# Altium PCB PCB_ESP_SparkBot_V1.1.pcbdoc (part 1 of 2)
Units mil, origin at the board's own origin, x right, y up, seen from the top; angles counter-clockwise.
Board outline 2353.91 x 3416.24 mil, 2 copper layers (Top Layer, Bottom Layer); 135 components, 107 nets, 461 pads, 252 vias.
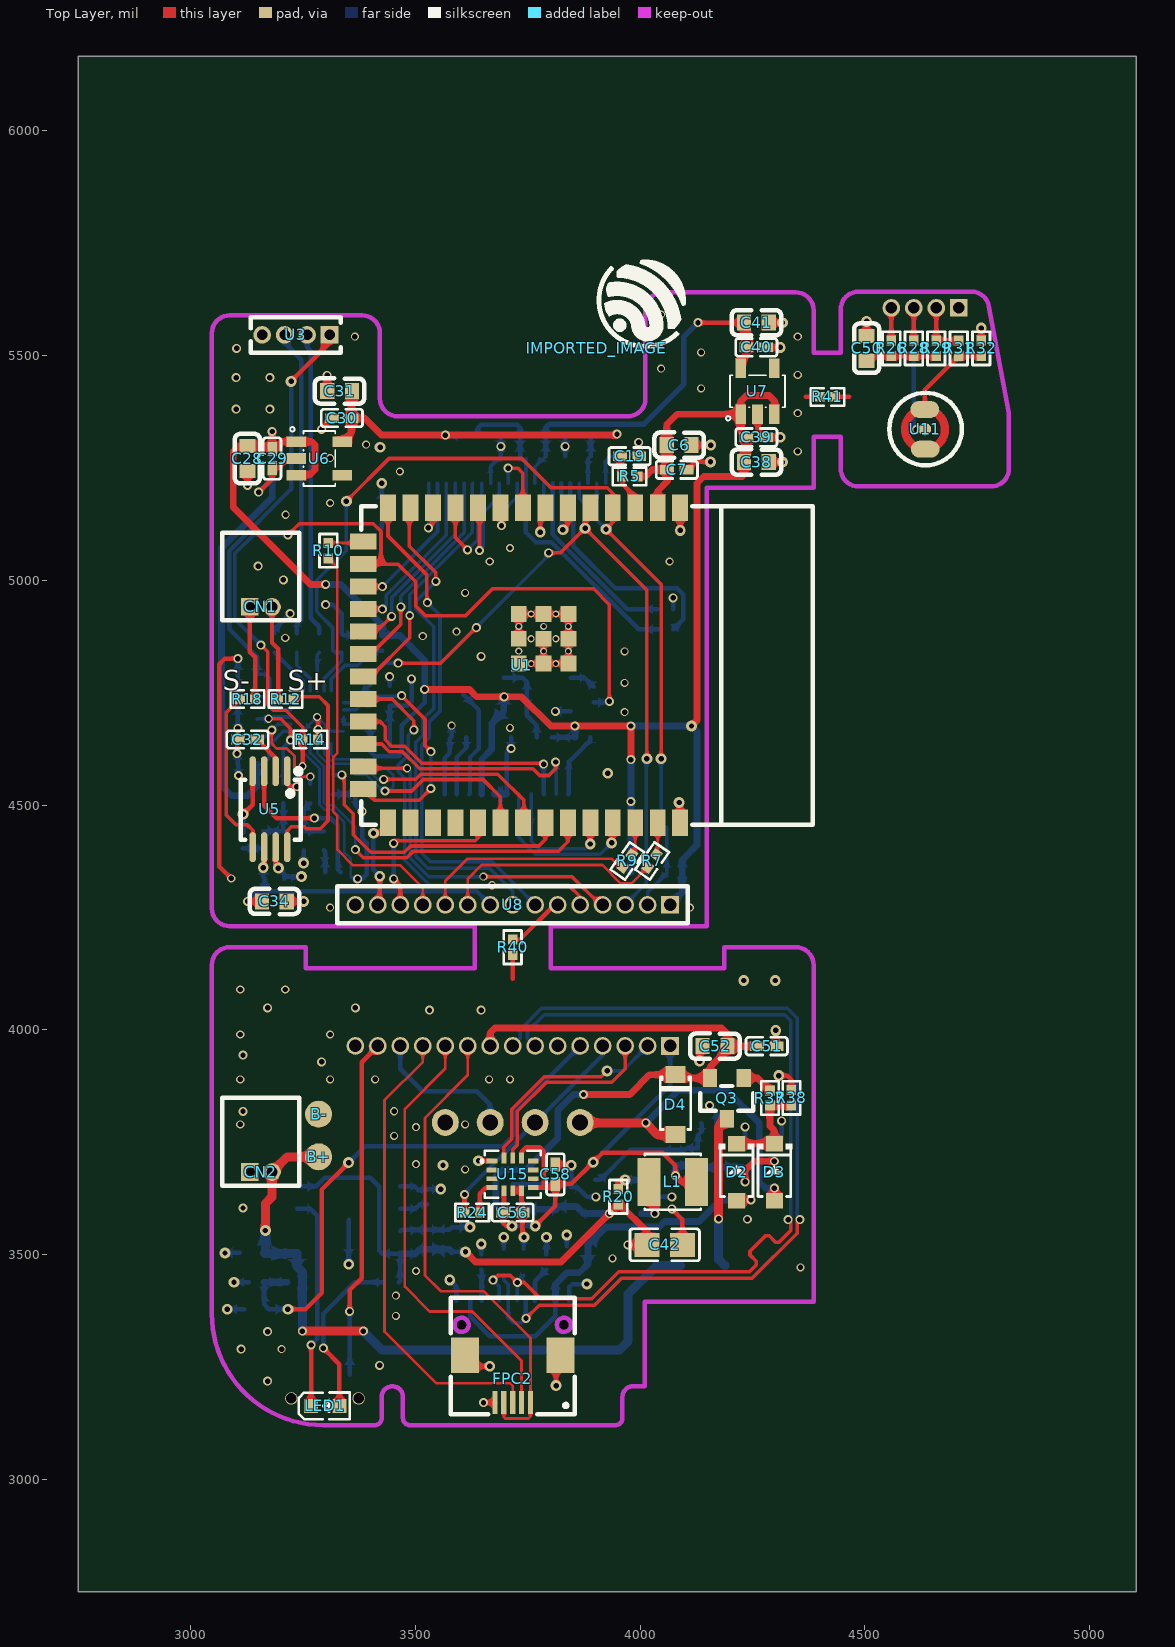
[diagram p0: Top Layer view]
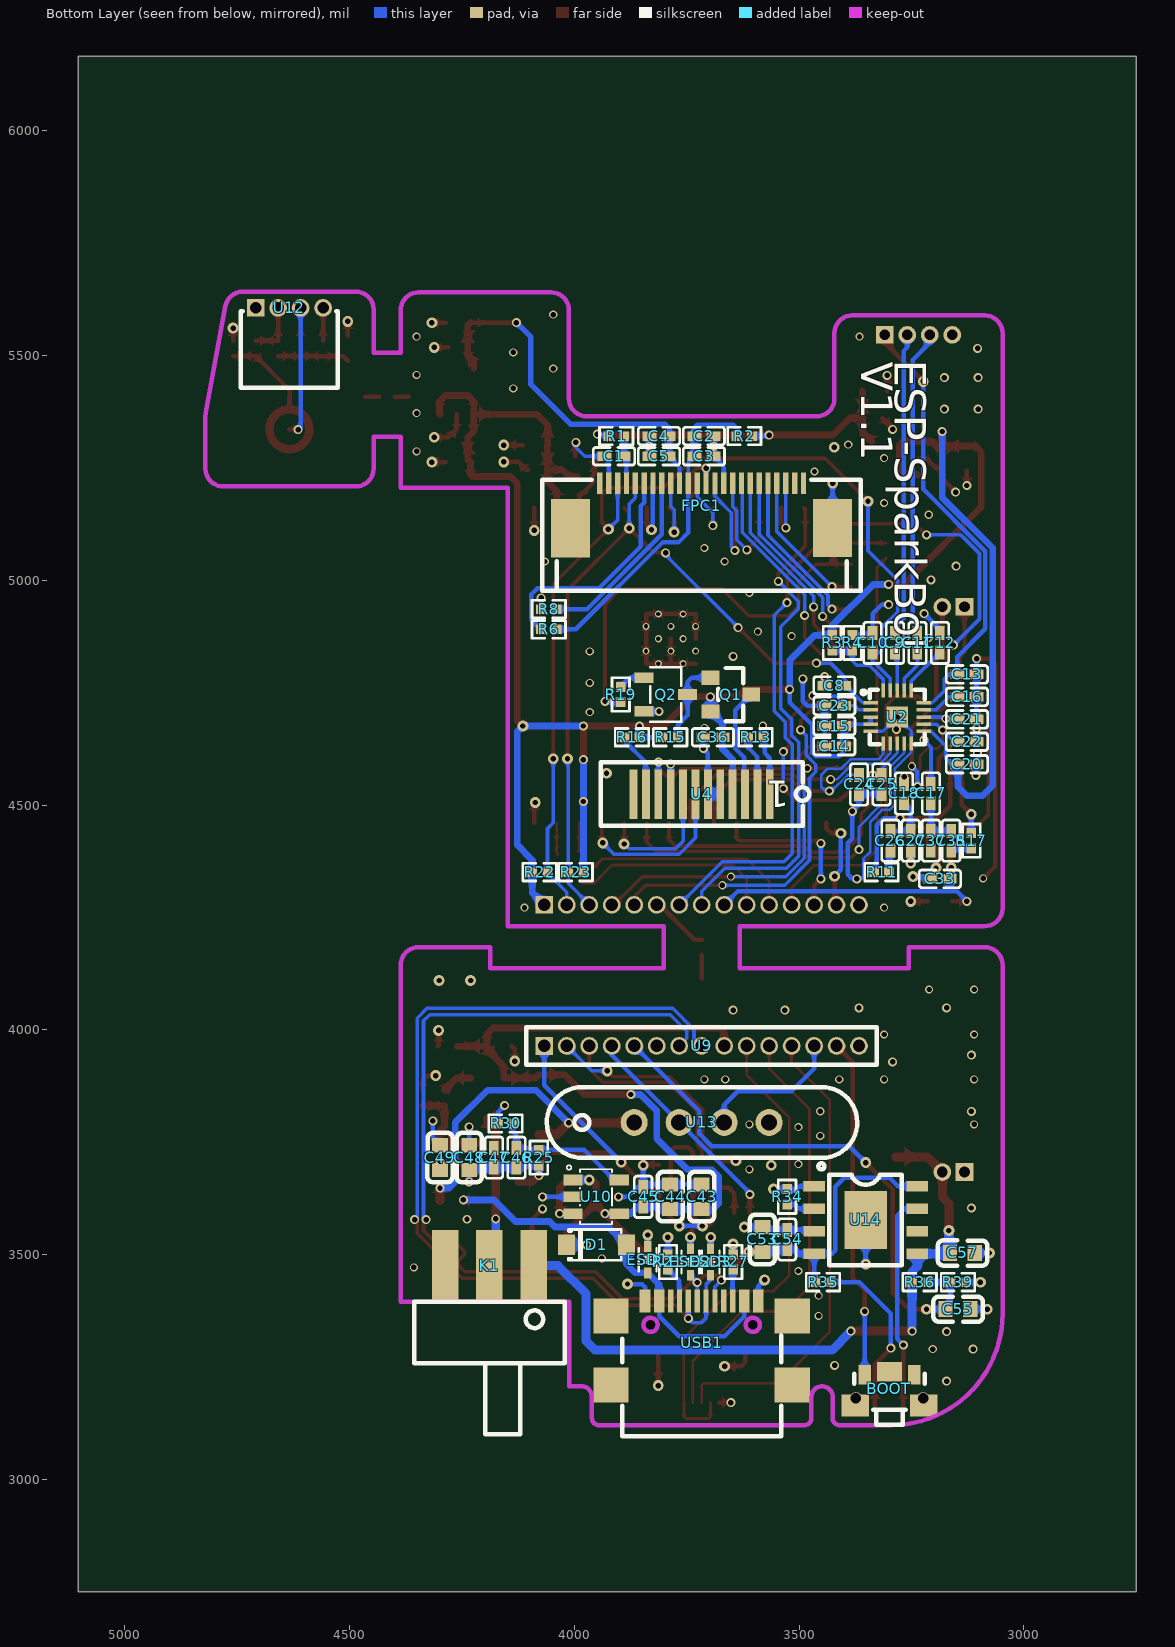
[diagram p1: Bottom Layer view, seen from below]

## Layer stack, top to bottom
Top Layer: signal copper (thickness not stored)
Dielectric: dielectric 12.6, FR-4, Dk 4.8
Bottom Layer: signal copper (thickness not stored)

## Board outline
5103.91,2750 2750,2750 2750,6166.24 5103.91,6166.24

## Design rules (kind name [scope] priority, off if disabled: settings)
BoardOutlineClearance copperThickness1oz [All] p0: genericclearance=10 ignorepadtopadclearanceinfootprint=FALSE except(0: Arc-SplitContinuation Track-SplitContinuation SMDPad-SplitContinuation THPad-SplitContinuation Via-SplitContinuation Fill-SplitContinuation Poly-SplitContinuation Region-SplitContinuation Text-SplitContinuation; 6: Track-CutoutEdge SMDPad-CutoutEdge THPad-CutoutEdge Via-CutoutEdge Region-CutoutEdge; 11.8: Track-OutlineEdge SMDPad-OutlineEdge THPad-OutlineEdge Via-OutlineEdge Fill-OutlineEdge Region-OutlineEdge Poly-OutlineEdge Text-OutlineEdge Fill-CutoutEdge)
BoardOutlineClearance copperThickness2oz [All] p0: genericclearance=10 ignorepadtopadclearanceinfootprint=FALSE except(0: Arc-SplitContinuation Track-SplitContinuation SMDPad-SplitContinuation THPad-SplitContinuation Via-SplitContinuation Fill-SplitContinuation Poly-SplitContinuation Region-SplitContinuation Text-SplitContinuation; 6: Track-CutoutEdge SMDPad-CutoutEdge THPad-CutoutEdge Via-CutoutEdge Region-CutoutEdge; 11.8: Track-OutlineEdge SMDPad-OutlineEdge THPad-OutlineEdge Via-OutlineEdge Fill-OutlineEdge Region-OutlineEdge Poly-OutlineEdge Text-OutlineEdge Fill-CutoutEdge)
Clearance copperThickness1oz [(InNet('VBAT') OR InNet('GND2') OR InNet('ESP_3V3') OR InNet('GND1') OR InNet('AVDD_2V8') OR InNet('DOVDD_2V8') OR InNet('VDD_1V5') OR InNet('VOUT') OR InNet('VDD_3V3') OR InNet('$1N4622') OR InNet('VDD_2V8') OR InNet('VBUS') OR InNet('VBAT_ADC') OR InNet('GPIO5') OR InNet('$1N7827') OR InNet('OUTN') OR InNet('$1N7839') OR InNet('OUTP') OR InNet('DACVREF') OR InNet('ADCVREF') OR InNet('$1N8195') OR InNet('$1N8310') OR InNet('MICN') OR InNet('$1N8316') OR InNet('MICP') OR InNet('$1N9095') OR InNet('$1N9430') OR InNet('$1N9720') OR InNet('$1N9932') OR InNet('$1N10469') OR InNet('$1N10489') OR InNet('USB_5V') OR InNet('$1N6548') OR InNet('DOCK_5V') OR InNet('D+') OR InNet('D-') OR InNet('GPIO4') OR InNet('CAM_RESET') OR InNet('DVP_VSYNC') OR InNet('CAM_PWDN') OR InNet('DVP_HREF') OR InNet('DVP_Y9') OR InNet('GPIO15') OR InNet('DVP_Y8') OR InNet('DVP_Y7') OR InNet('DVP_PCLK') OR InNet('DVP_Y6') OR InNet('DVP_Y2') OR InNet('DVP_Y5') OR InNet('DVP_Y3') OR InNet('DVP_Y4') OR InNet('$1N4546') OR InNet('GPIO3') OR InNet('$1N3726') OR InNet('GPIO48') OR InNet('$1N3613') OR InNet('$1N4996') OR InNet('$1N6113') OR InNet('$1N6102') OR InNet('$1N6963') OR InNet('$1N8394') OR InNet('$1N8985') OR InNet('MICN_SUB') OR InNet('MICP_SUB') OR InNet('ADCVREF_SUB') OR InNet('PA_INL+') OR InNet('PA_INL-') OR InNet('PA_OUTL+') OR InNet('EN') OR InNet('GPIO46') OR InNet('GPIO14') OR InNet('GPIO21') OR InNet('GPIO47') OR InNet('GPIO0') OR InNet('GPIO38') OR InNet('GPIO39') OR InNet('GPIO40') OR InNet('GPIO41') OR InNet('GPIO42') OR InNet('GPIO44') OR InNet('GPIO43') OR InNet('GPIO2') OR InNet('GPIO1') OR InNet('IMU_SDA') OR InNet('IMU_SCL') OR InNet('TOUCH_BTN1') OR InNet('TOUCH_BTN2') OR InNet('TOUCH_BTN3') OR InNet('USB_D+') OR InNet('USB_D-') OR InNet('GND3') OR InNet('$1N15212') OR InNet('IMU_INT') OR InNet('SUB_GPIO0') OR InNet('$1N15191') OR InNet('$1N16298') OR InNet('PA_OUTL-') OR InNet('TP_GPIO1') OR InNet('TP_GPIO2') OR InNet('TP_GPIO3') OR InNet('GPIO45') OR InNet('$1N31690') OR InNet('$1N31661') OR InNet('SUB_GPIO38') OR InNet('SUB_GPIO48') OR InNet('VBAT_OUT') OR InNet('$1N53778'))] p1: gap=7 ignorepadtopadclearanceinfootprint=FALSE except(4: Track-Track; 6: Track-SMDPad SMDPad-SMDPad Track-THPad SMDPad-THPad THPad-THPad Track-Via SMDPad-Via THPad-Via Via-Via SMDPad-Fill THPad-Fill Via-Fill Fill-Fill Track-Region SMDPad-Region THPad-Region Via-Region Region-Region Track-Poly SMDPad-Poly THPad-Poly Via-Poly Fill-Poly Region-Poly Poly-Poly Track-Text SMDPad-Text THPad-Text Via-Text Fill-Text Region-Text Poly-Text Text-Text; 6.9: Track-Hole SMDPad-Hole THPad-Hole Via-Hole Fill-Hole Region-Hole Poly-Hole Text-Hole Sheet-Hole; 11.8: Track-Fill Fill-Region Track-Sheet SMDPad-Sheet THPad-Sheet Via-Sheet Fill-Sheet Region-Sheet Poly-Sheet Text-Sheet)
Clearance copperThickness2oz [All] p1: gap=7 ignorepadtopadclearanceinfootprint=FALSE except(6: Track-SMDPad SMDPad-SMDPad Track-THPad SMDPad-THPad THPad-THPad Track-Via SMDPad-Via THPad-Via Via-Via SMDPad-Fill THPad-Fill Via-Fill Fill-Fill Track-Region SMDPad-Region THPad-Region Via-Region Region-Region Track-Poly SMDPad-Poly THPad-Poly Via-Poly Fill-Poly Region-Poly Poly-Poly Track-Text SMDPad-Text THPad-Text Via-Text Fill-Text Region-Text Poly-Text Text-Text; 6.9: Track-Hole SMDPad-Hole THPad-Hole Via-Hole Fill-Hole Region-Hole Poly-Hole Text-Hole Sheet-Hole; 8: Track-Track; 11.8: Track-Fill Fill-Region Track-Sheet SMDPad-Sheet THPad-Sheet Via-Sheet Fill-Sheet Region-Sheet Poly-Sheet Text-Sheet)
DiffPairsRouting differentialPair [All] p1: maxuncoupledlength=10 minlimit=6 maxlimit=6 mostfreqgap=6 toplayer_minwidth=5 toplayer_prefwidth=10 toplayer_maxwidth=100 bottomlayer_minwidth=5 bottomlayer_prefwidth=10 bottomlayer_maxwidth=100
PasteMaskExpansion pasteMaskExpansion [All] p1: expansion=0
PlaneConnect innerPlane [All] p1: planeconnectstyle=Relief reliefexpansion=20 reliefentries=4 reliefconductorwidth=10 reliefairgap=10
PolygonConnect copperRegion [All] p1: connectstyle=Relief reliefentries=4 reliefconductorwidth=10 polygonreliefangle="90 Angle" airgapwidth=10
RoutingVias viaSize [All] p1: viastyle="Through Hole" holewidth=12 minholewidth=11.8 maxholewidth=248 width=20 minwidth=18 maxwidth=393.7
SolderMaskExpansion solderMaskExpansion [All] p1: useseparateexpansions=TRUE expansion=2 expansionbottom=2
Width copperThickness1oz [All] p1: maxlimit=100 minlimit=5 preferedwidth=10
Width copperThickness2oz [All] p1: maxlimit=100 minlimit=8 preferedwidth=10

## Components (designator, comment, footprint, x,y, rotation, side; value= is the part's Value field where it differs from the comment)
B+ "test_point" test_point 3285.09,3717.96 r180 top
B- "test_point" test_point 3285.09,3812.65 r180 top
BOOT "EVPAKE31A" SW-TH_PANASONIC_EVPAKE31A 3299.18,3202.14 r0 bottom
C1 "CAP_0402" C0402 3911.82,5276.05 r180 bottom
C2 "CAP_0402" C0402 3711.82,5321.05 r0 bottom
C3 "CAP_0402" C0402 3711.82,5276.05 r0 bottom
C4 "CAP_0402" C0402 3811.82,5321.05 r180 bottom
C5 "CAP_0402" C0402 3811.82,5276.05 r180 bottom
C6 "CAP_0603" C0603 4086.82,5301.05 r180 top
C7 "CAP_0402" C0402 4081.82,5246.05 r180 top
C8 "CAP_0402" C0402 3421.82,4766.05 r180 bottom
C9 "CAP_0402" C0402 3286.82,4861.05 r270 bottom
C10 "CAP_0402" C0402 3336.82,4861.05 r270 bottom
C11 "CAP_0402" C0402 3236.82,4861.05 r270 bottom
C12 "CAP_0402" C0402 3186.82,4861.05 r270 bottom
C13 "CAP_0402" C0402 3126.82,4791.05 r0 bottom
C14 "CAP_0402" C0402 3421.82,4631.05 r0 bottom
C15 "CAP_0402" C0402 3421.82,4676.05 r0 bottom
C16 "CAP_0402" C0402 3126.82,4741.05 r0 bottom
C17 "CAP_0402" C0402 3206.82,4526.05 r90 bottom
C18 "CAP_0402" C0402 3266.82,4526.05 r90 bottom
C19 "CAP_0402" C0402 3976.82,5276.05 r180 top
C20 "CAP_0402" C0402 3126.82,4591.05 r0 bottom
C21 "CAP_0402" C0402 3126.82,4691.05 r0 bottom
C22 "CAP_0402" C0402 3126.82,4641.05 r0 bottom
C23 "CAP_0402" C0402 3421.82,4721.05 r180 bottom
C24 "CAP_0402" C0402 3366.82,4546.05 r90 bottom
C25 "CAP_0402" C0402 3316.82,4546.05 r90 bottom
C26 "CAP_0402" C0402 3296.82,4421.05 r90 bottom
C27 "CAP_0402" C0402 3251.82,4421.05 r90 bottom
C28 "CAP_0603" C0603 3126.82,5271.05 r90 top
C29 "CAP_0402" C0402 3181.82,5271.05 r90 top
C30 "CAP_0402" C0402 3336.82,5361.05 r0 top
C31 "CAP_0603" C0603 3331.82,5421.05 r0 top
C32 "CAP_0402" C0402 3126.82,4646.05 r0 top
C33 "CAP_0402" C0402 3186.82,4336.05 r180 bottom
C34 "CAP_0603" C0603 3186.82,4286.05 r180 top
C35 "CAP_0402" C0402 3161.82,4421.05 r90 bottom
C36 "CAP_0402" C0402 3691.82,4651.05 r180 bottom
C37 "CAP_0402" C0402 3206.82,4421.05 r90 bottom
C38 "CAP_0603" C0603 4258.7,5263.14 r180 top
C39 "CAP_0402" C0402 4258.7,5318.14 r180 top
C40 "CAP_0402" C0402 4258.7,5518.14 r180 top
C41 "CAP_0603" C0603 4258.7,5573.14 r180 top
C42 "CAP_0805" C0805 4054.82,3522 r180 top
C43 "CAP_0603" C0603 3716.82,3629 r270 bottom
C44 "CAP_0603" C0603 3786.82,3629 r270 bottom
C45 "CAP_0402" C0402 3846.82,3629 r270 bottom
C46 "CAP_0402" C0402 4128.82,3716 r270 bottom
C47 "CAP_0402" C0402 4178.82,3716 r270 bottom
C48 "CAP_0603" C0603 4233.82,3716 r270 bottom
C49 "CAP_0603" C0603 4298.82,3716 r270 bottom
C50 "CAP_0603" C0603 4503.91,5516.05 r270 top
C51 "CAP_0402" C0402 4281.82,3964 r180 top
C52 "CAP_0603" C0603 4166.82,3964 r0 top
C53 "CAP_0603" C0603 3581.82,3534 r270 bottom
C54 "CAP_0402" C0402 3526.82,3534 r270 bottom
C55 "CAP_0603" C0603 3146.82,3379 r0 bottom
C56 "CAP_0402" C0402 3716.82,3594 r180 top
C57 "CAP_0603" C0603 3136.82,3504 r0 bottom
C58 "CAP_0402" C0402 3811.82,3679 r270 top
CN1 "1.25T-2AW" CONN-TH_1.25T-2AW 3156.82,4941.05 r0 top
CN2 "1.25T-2AW" CONN-TH_1.25T-2AW 3156.82,3684 r0 top
D1 "DSS24" SOD-123_L2.8-W1.8-LS3.7-RD 3950.82,3522 r180 bottom
D2 "B5819W_C7420330" SOD-123_L2.7-W1.6-LS3.7-FD 4214.82,3684 r90 top
D3 "B5819W_C7420330" SOD-123_L2.7-W1.6-LS3.7-FD 4298.82,3684 r90 top
D4 "DSS24" SOD-123_L2.8-W1.8-LS3.7-RD 4078.82,3834 r270 top
ESD1 "LESD5D5.0CT1G" SOD-523_L1.2-W0.8-LS1.6-BI 3836.82,3489 r270 bottom
ESD2 "LESD5D5.0CT1G" SOD-523_L1.2-W0.8-LS1.6-BI 3741.82,3484 r270 bottom
ESD3 "LESD5D5.0CT1G" SOD-523_L1.2-W0.8-LS1.6-BI 3696.82,3484 r270 bottom
FPC1 "AFC07-S24ECA-00" FPC-SMD_AFC07-S24ECA-00 3716.82,5166.05 r180 bottom
FPC2 "AFC01-S05FCA-00" FPC-SMD_AFC01-S05FCA-00 3716.82,3224 r180 top locked
IMPORTED_IMAGE "IMPORTED_IMAGE" IMPORTED_IMAGE 3903.47,5516.05 r0 top
K1 "SS-12D00G4-4MM" SS-12D00G4 4188.82,3396 r0 bottom locked
L1 "FNR3015S2R2MT" IND-SMD_L3.0-W3.0_FNR30XXS 4072.82,3662 r180 top
LED1 "LED_0603-R" LED_0603 3301.82,3164 r0 top
Q1 "AO3401A_C15127" SOT-23_L2.9-W1.3-P1.90-LS2.4-BR 3651.82,4746.05 r0 bottom
Q2 "S8050_C181158" SOT-23-3_L2.9-W1.6-P1.90-LS2.8-BR 3796.82,4746.05 r0 bottom
Q3 "AO3401A_C15127" SOT-23_L2.9-W1.3-P1.90-LS2.4-BR 4193.26,3847.82 r90 top
R1 "Res_0402" R0402 3906.82,5321.05 r180 bottom
R2 "Res_0402" R0402 3621.82,5321.05 r0 bottom
R3 "Res_0402" R0402 3426.82,4861.05 r90 bottom
R4 "Res_0402" R0402 3381.82,4861.05 r270 bottom
R5 "Res_0402" R0402 3976.82,5231.05 r0 top
R6 "Res_0402" R0402 4056.82,4891.05 r0 bottom
R7 "Res_0402" R0402 4026.82,4376.05 r235 top
R8 "Res_0402" R0402 4056.82,4936.05 r180 bottom
R9 "Res_0402" R0402 3971.82,4376.05 r235 top
R10 "Res_0402" R0402 3306.82,5066.05 r270 top
R11 "Res_0402" R0402 3316.82,4351.05 r180 bottom
R12 "Res_0402" R0402 3211.82,4736.05 r180 top
R13 "Res_0402" R0402 3596.82,4651.05 r0 bottom
R14 "Res_0402" R0402 3266.82,4646.05 r180 top
R15 "Res_0402" R0402 3786.82,4651.05 r0 bottom
R16 "Res_0402" R0402 3871.82,4651.05 r180 bottom
R17 "Res_0402" R0402 3116.82,4421.05 r270 bottom
R18 "Res_0402" R0402 3126.82,4736.05 r0 top
R19 "Res_0402" R0402 3896.82,4746.05 r90 bottom
R20 "Res_0402" R0402 3951.82,3629 r270 top
R21 "Res_0402" R0402 3791.82,3484 r90 bottom
R22 "Res_0402" R0402 4076.82,4351.05 r180 bottom
R23 "Res_0402" R0402 3996.82,4351.05 r0 bottom
R24 "Res_0402" R0402 3626.82,3594 r180 top
R25 "Res_0402" R0402 4078.82,3716 r270 bottom
R26 "Res_0402" R0402 4558.91,5516.05 r270 top
R27 "Res_0402" R0402 3646.82,3484 r90 bottom
R28 "Res_0402" R0402 4608.91,5516.05 r270 top
R29 "Res_0402" R0402 4658.91,5516.05 r270 top
R30 "Res_0402" R0402 4152.82,3792 r180 bottom
R31 "Res_0402" R0402 4708.91,5516.05 r270 top
R32 "Res_0402" R0402 4758.91,5516.05 r270 top
R34 "Res_0402" R0402 3526.82,3629 r270 bottom
R35 "Res_0402" R0402 3446.82,3439 r0 bottom
R36 "Res_0402" R0402 3231.82,3439 r180 bottom
R37 "Res_0402" R0402 4289.07,3848.68 r90 top
R38 "Res_0402" R0402 4336.82,3849 r90 top
R39 "Res_0402" R0402 3146.82,3439 r180 bottom
R40 "Res_0402" R0402 3716.82,4184 r270 top
R41 "Res_0402" R0402 4416.82,5408 r0 top
U1 "ESP32-S3-WROOM-1-N8" WIFIM-SMD_ESP32-S3-WROOM-1-N8 3736.82,4811.05 r270 top
U2 "ES8311" WQFN-20_L3.0-W3.0-P0.40-BL-EP1.7 3281.82,4696.06 r270 bottom
U3 "X1311WV-04J-C18D27" HDR-TH_4P-P1.27-V-M 3234.54,5546.05 r180 top
U4 "1.54 Inch LCD" LCD_12P_0.7M 3716.82,4524.75 r270 bottom
U5 "NS4150B_C189961" MSOP-8_L3.0-W3.0-P0.65-LS5.0-BL 3176.82,4491.05 r180 top
U6 "ME6211C28M5G-N" SOT-23-5_L3.0-W1.7-P0.95-LS2.8-BR 3286.82,5271.05 r180 top
U7 "ME6211C15M5G-N" SOT-23-5_L3.0-W1.7-P0.95-LS2.8-BR 4261.2,5420.64 r270 top
U8 "PZ127-1-15-Z" HDR-TH_15P-P1.27-V-M 3716.82,4278.29 r180 top
U9 "PZ127-1-15-Z" HDR-TH_15P-P1.27-V-M 3716.82,3964.51 r180 bottom locked
U10 "SY8088AAC" SOT-23-5_L3.0-W1.7-P0.95-LS2.8-BR 3951.82,3629 r0 bottom
U11 "B4013AM422-42" MIC-SMD_3P-BD4.0-P1.35_B4013AM423-093 4633.91,5336.05 r180 top
U12 "X1311FR-04-C43D24" HDR-TH_4P-P1.27-H-F-W4.5-N 4633.91,5606.05 r180 bottom
U13 "磁吸母座_4P" 磁吸母座_4P 3716.82,3794.24 r180 bottom locked
U14 "TP4056_C725790" ESOP-8_L4.9-W3.9-P1.27-LS6.0-BL-EP 3352.04,3577.36 r270 bottom
U15 "BMI270" LGA-14_L3.0-W2.5-P0.50-BR 3716.82,3679 r180 top
USB1 "TYPEC-304YSSW-ACP16" USB-SMD_TYPEC-304YSSW-ACP16 3716.82,3304 r180 bottom locked

## Footprints (in the part's own frame and the unit in brackets; to place one, negate y for a bottom-side part, rotate by r counter-clockwise, add the part's x,y. Pads: shape width x height; smd on the part's side, far side on the other; paste and mask are expansions set on the pad)
C0402 [mm]
  rect 0.79x0.54 smd: 1(-0.545,0) 2(0.545,0)
  silkscreen extent -1.17,-0.5 1.17,0.5
C0603 [mm]
  rect 0.8x0.9 smd: 1(-0.7,0) 2(0.7,0)
  silkscreen extent -1.41,-0.71 1.39,0.72
C0805 [mm]
  rect 1.41x1.35 smd: 1(-1,0) 2(1,0)
  silkscreen extent -1.96,-0.9 1.96,0.9
CONN-TH_1.25T-2AW [mm]
  rect 1x1 hole 0.6: 1(-0.625,0)
  round 1 hole 0.6: 2(0.625,0)
  silkscreen extent -2.17,-0.76 2.18,4.2
ESOP-8_L4.9-W3.9-P1.27-LS6.0-BL-EP [mm]
  rect 0.6x1.2 smd: 1(-1.905,-2.908) 2(-0.635,-2.908) 3(0.635,-2.908) 4(1.905,-2.908) 5(1.905,2.908) 6(0.635,2.908) 7(-0.635,2.908) 8(-1.905,2.908)
  rect 3.3x2.4 smd: 9(0,0)
  silkscreen extent -3.2,-2.67 2.55,2.05
FPC-SMD_AFC01-S05FCA-00 [mm]
  rect 0.3x1.3 smd: 1(-1,1.34) 2(-0.5,1.34) 3(0,1.34) 4(0.5,1.34) 5(1,1.34)
  rect 1.6x2 smd: 6(2.7,-1.34) 7(-2.7,-1.34)
  silkscreen extent -3.5,-4.57 3.5,2
FPC-SMD_AFC07-S24ECA-00 [mm]
  rect 0.3x1.2 smd: 1(-5.75,1.266) 2(-5.25,1.266) 3(-4.749,1.266) 4(-4.251,1.266) 5(-3.751,1.266) 6(-3.251,1.266) 7(-2.75,1.266) 8(-2.25,1.266) 9(-1.749,1.266) 10(-1.25,1.266) 11(-0.75,1.266) 12(-0.251,1.266) 13(0.25,1.266) 14(0.75,1.266) 15(1.25,1.266) 16(1.751,1.266) 17(2.25,1.266) 18(2.749,1.266) 19(3.249,1.266) 20(3.75,1.266) 21(4.25,1.266) 22(4.75,1.266) 23(5.251,1.266) 24(5.75,1.266)
  rect 2.2x3.3 smd: 25(-7.401,-1.266) 26(7.401,-1.259)
  silkscreen extent -9,-4.8 9,1.46
HDR-TH_4P-P1.27-H-F-W4.5-N [mm]
  rect 1x1 hole 0.65: 1(-1.905,0)
  round 1 hole 0.65: 2(-0.635,0) 3(0.635,0) 4(1.905,0)
  silkscreen extent -2.74,-4.5 2.74,-0.2
HDR-TH_4P-P1.27-V-M [mm]
  rect 1x1 hole 0.6: 1(-1.905,0)
  round 1 hole 0.6: 2(-0.635,0) 3(0.635,0) 4(1.905,0)
  silkscreen extent -2.54,-1 2.54,1
HDR-TH_15P-P1.27-V-M [mm]
  rect 1x1 hole 0.7: 1(-8.89,0)
  round 1 hole 0.7: 2(-7.62,0) 3(-6.35,0) 4(-5.08,0) 5(-3.81,0) 6(-2.54,0) 7(-1.27,0) 8(0,0) 9(1.27,0) 10(2.54,0) 11(3.81,0) 12(5.08,0) 13(6.35,0) 14(7.62,0) 15(8.89,0)
  silkscreen extent -9.9,-1.05 9.9,1.05
IMPORTED_IMAGE [mil]
  silkscreen extent 0,0 198,197
IND-SMD_L3.0-W3.0_FNR30XXS [mm]
  rect 1.3x2.72 smd: 1(1.35,0) 2(-1.35,0)
  silkscreen extent -1.58,-1.58 1.58,1.58
LCD_12P_0.7M [mm]
  rect 2.8x0.44 smd: 1(0,3.85) 2(0,3.15) 3(0,2.45) 4(0,1.75) 5(0,1.05) 6(0,0.35) 7(0,-0.35) 8(0,-1.05) 9(0,-1.75) 10(0,-2.45) 11(0,-3.15) 12(0,-3.85)
  silkscreen extent -1.8,-5.7 1.8,6.08
LED_0603 [mil]
  rect 31.5x31.5 smd: 1(-33.5,-0.4) 2(29.5,-0.2)
  silkscreen extent -61,-30 53,30
LGA-14_L3.0-W2.5-P0.50-BR [mm]
  rect 0.6x0.27 smd: 1(1.17,-0.75) 2(1.17,-0.25) 3(1.17,0.25) 4(1.17,0.75) 8(-1.17,0.75) 9(-1.17,0.25) 10(-1.17,-0.25) 11(-1.17,-0.75)
  rect 0.27x0.6 smd: 5(0.5,0.92) 6(0,0.92) 7(-0.5,0.92) 12(-0.5,-0.92) 13(0,-0.92) 14(0.5,-0.92)
  silkscreen extent -1.58,-1.33 1.8,1.33
MIC-SMD_3P-BD4.0-P1.35_B4013AM423-093 [mil]
  round 27.56 smd: 1(0,-0.16)
  oval 63.78x37.5 smd: 2(-0.5,44.13)
  oval 63.77x37.37 smd: 2(0.5,-44.12)
  Top Layer region: 213 vertices and 0 holes, not listed, extent -53.14,-9.52 53.15,52.98
  Top Layer region: 212 vertices and 0 holes, not listed, extent -53.14,-53.1 53.15,9.19
  silkscreen extent -82,-81 80,80
MSOP-8_L3.0-W3.0-P0.65-LS5.0-BL [mil]
  oval 14.33x66.61 smd: 1(-38.39,-84.49) 2(-12.79,-84.49) 3(12.8,-84.49) 4(38.39,-84.49) 5(38.39,84.49) 6(12.8,84.49) 7(-12.79,84.49) 8(-38.39,84.49)
  silkscreen extent -69,-90 65,68
R0402 [mm]
  rect 0.566x0.54 smd: 1(-0.433,0) 2(0.433,0)
  silkscreen extent -0.94,-0.5 0.94,0.5
SOD-123_L2.7-W1.6-LS3.7-FD [mm]
  rect 0.88x0.96 smd: 1(-1.61,0) 2(1.61,0)
  silkscreen extent -1.38,-1 1.6,1
SOD-123_L2.8-W1.8-LS3.7-RD [mm]
  rect 0.95x1.15 smd: 1(-1.692,0) 2(1.692,0)
  silkscreen extent -1.58,-0.87 1.41,0.87
SOD-523_L1.2-W0.8-LS1.6-BI [mm]
  rect 0.6x0.4 smd: 1(-0.75,0) 2(0.75,0)
  silkscreen extent -0.65,-0.5 0.65,0.5
SOT-23-3_L2.9-W1.6-P1.90-LS2.8-BR [mm]
  rect 1.07x0.6 smd: 1(1.235,-0.95) 2(1.235,0.95) 3(-1.235,0)
  silkscreen extent -0.88,-1.54 0.88,1.54
SOT-23-5_L3.0-W1.7-P0.95-LS2.8-BR [mm]
  rect 1.1x0.6 smd: 1(1.3,-0.95) 2(1.3,0) 3(1.3,0.95) 4(-1.3,0.95) 5(-1.3,-0.95)
  silkscreen extent -0.9,-1.78 1.65,1.55
SOT-23_L2.9-W1.3-P1.90-LS2.4-BR [mm]
  rect 1x0.8 smd: 1(1.15,-0.95) 2(1.15,0.95) 3(-1.15,0)
  silkscreen extent -0.7,-1.5 0.7,1.5
SS-12D00G4 [mm]
  rect 1.5x4 smd: 1(-2.5,-2.032) 2(0,-2.032) 3(2.5,-2.032)
  silkscreen extent -4.25,0 4.25,7.5
SW-TH_PANASONIC_EVPAKE31A [mm]
  rect 0.7x1.1 smd: 1(-1.4,-0.8) 3(1.4,-0.8)
  rect 1.4x1.1 smd: 2(0,-0.95)
  round 0.7 hole 0.6: 4(1.9,0.55) 5(-1.9,0.55)
  rect 1.57x1.25 smd: 4(1.935,0.95) 5(-1.935,0.95)
  silkscreen extent -1.98,-0.85 1.98,2.05
test_point [mil]
  round 60 smd: 1(0,0)
USB-SMD_TYPEC-304YSSW-ACP16 [mm]
  rect 2x2 smd: 13(-5.12,1.52) 14(5.12,1.52) 15(-5.12,-2.38) 16(5.12,-2.38)
  rect 0.6x1.3 smd: A1B12(-3.2,2.38) A4B9(-2.4,2.38) B1A12(3.2,2.38) B4A9(2.4,2.38)
  rect 0.3x1.3 smd: A5(-1.25,2.38) A6(-0.25,2.38) A7(0.25,2.38) A8(1.25,2.38) B5(1.75,2.38) B6(0.75,2.38) B7(-0.75,2.38) B8(-1.75,2.38)
  Board Outline Layer circle w0.005: c2.89,1.02 r0.4
  Board Outline Layer circle w0.005: c-2.89,1.02 r0.4
  Board Outline Layer circle w0.254: c2.89,1.02 r0.4
  Board Outline Layer circle w0.254: c-2.89,1.02 r0.4
  Multi-Layer board cut-out: 2.49,1.02 2.546,1.217 2.692,1.361 2.89,1.413 3.088,1.361 3.234,1.217 3.29,1.02 3.29,1.02 3.234,0.823 3.088,0.679 2.89,0.626 2.692,0.679 2.546,0.823 2.49,1.02
  Multi-Layer board cut-out: -3.29,1.02 -3.234,1.217 -3.088,1.361 -2.89,1.413 -2.692,1.361 -2.546,1.217 -2.49,1.02 -2.49,1.02 -2.546,0.823 -2.692,0.679 -2.89,0.626 -3.088,0.679 -3.234,0.823 -3.29,1.02
  silkscreen extent -4.5,-5.27 4.5,0.43
WIFIM-SMD_ESP32-S3-WROOM-1-N8 [mm]
  rect 1.5x0.9 smd: 1(-8.9,8.955) 2(-8.9,7.685) 3(-8.9,6.415) 4(-8.9,5.145) 5(-8.9,3.875) 6(-8.9,2.605) 7(-8.9,1.335) 8(-8.9,0.065) 9(-8.9,-1.205) 10(-8.9,-2.475) 11(-8.9,-3.745) 12(-8.9,-5.015) 13(-8.9,-6.285) 14(-8.9,-7.555) 27(8.9,-7.555) 28(8.9,-6.285) 29(8.9,-5.015) 30(8.9,-3.745) 31(8.9,-2.475) 32(8.9,-1.205) 33(8.9,0.065) 34(8.9,1.335) 35(8.9,2.605) 36(8.9,3.875) 37(8.9,5.145) 38(8.9,6.415) 39(8.9,7.685) 40(8.9,8.955)
  rect 0.9x1.5 smd: 15(-6.985,-8.955) 16(-5.715,-8.955) 17(-4.445,-8.955) 18(-3.175,-8.955) 19(-1.905,-8.955) 20(-0.635,-8.955) 21(0.635,-8.955) 22(1.905,-8.955) 23(3.175,-8.955) 24(4.445,-8.955) 25(5.715,-8.955) 26(6.985,-8.955)
  rect 0.9x0.9 smd: 41(-2.9,1.235) 41(-2.9,2.635) 41(-2.9,-0.165) 41(-1.499,2.635) 41(-1.499,1.235) 41(-1.499,-0.165) 41(-0.099,2.635) 41(-0.099,1.235) 41(-0.099,-0.165)
  silkscreen extent -9,-9.05 9,16.45
WQFN-20_L3.0-W3.0-P0.40-BL-EP1.7 [mm]
  rect 0.2x0.8 smd: 1(-0.8,-1.5) 2(-0.4,-1.5) 3(0,-1.5) 4(0.4,-1.5) 5(0.8,-1.5) 11(0.8,1.5) 12(0.4,1.5) 13(0,1.5) 14(-0.4,1.5) 15(-0.8,1.5)
  rect 0.8x0.2 smd: 6(1.5,-0.8) 7(1.5,-0.4) 8(1.5,0) 9(1.5,0.4) 10(1.5,0.8) 16(-1.5,0.8) 17(-1.5,0.4) 18(-1.5,0) 19(-1.5,-0.4) 20(-1.5,-0.8)
  rect 1.2x1.2 smd: 21(0,0)
  silkscreen extent -1.55,-2 1.55,1.55
磁吸母座_4P [mil]
  round 60 hole 35.43: 1(-150,0) 2(-50,0) 3(50,0) 4(150,0)
  silkscreen extent -345,-79 346,79

## Via types
v1: diameter 20, hole 12, Top Layer to Bottom Layer, 106 vias
v2: diameter 24.02, hole 12.01, Top Layer to Bottom Layer, 64 vias
v3: diameter 18, hole 12, Top Layer to Bottom Layer, 57 vias
v4: diameter 20, hole 12.01, Top Layer to Bottom Layer, 12 vias
v5: diameter 15.75, hole 9.84, Top Layer to Bottom Layer, 12 vias
v6: diameter 18, hole 12.01, Top Layer to Bottom Layer, 1 vias

## Nets (pads, with @x,y where several pads share a name; then routed paths per layer and width w, separated by ;. In a path a pad name is that pad's centre, name@x,y a point inside that pad or via, vN(x,y) a via of type N, cw(c..) or ccw(c..) an arc to the next point about the centre after c; other vN are vias at no path point)
$1N3613: R13.2 U4.2 | length 135
  Bottom Layer w10: U4.2@3592.8,4524.75 3592.8,4607.03 3613.86,4628.09 R13.2@3613.86,4651.05
$1N3726: R16.1 U4.11 | length 146.2
  Bottom Layer w10: U4.11@3840.83,4524.75 3841.82,4525.73 3841.82,4596.05 3888.86,4643.09 R16.1@3888.86,4651.05
$1N4546: L1.1 U10.3 | length 105.7
  Top Layer w15: L1.1@4019.67,3662 4032.82,3648.85 v1(4032.82,3591.6)
  Bottom Layer w15: U10.3@4003,3591.6 v1(4032.82,3591.6)
$1N4622: C46.1 R25.1 R30.2 U10.5 | length 315.9
  Bottom Layer w10: U10.5@3900.63,3666.4 3911.22,3666.4 3977.86,3733.04 R25.1@4078.82,3733.04 4099.86,3733.04 4104.28,3737.46 C46.1@4128.82,3737.46 4128.82,3766 4136.82,3774 4136.82,3790.96 R30.2@4135.78,3792
$1N4996: R20.1 U10.1 | length 67.3
  Top Layer w15: R20.1@3951.82,3646.04 3951.82,3659 3959.32,3666.5 v2(3966.82,3666.5)
  Bottom Layer w15: v2(3966.82,3666.5) 4002.9,3666.5 U10.1@4003,3666.4
$1N6102: R27.1 USB1.B5 | length 69.7
  Bottom Layer w10: R27.1@3646.82,3466.96 3647.91,3465.86 USB1.B5@3647.91,3397.7
$1N6113: R21.1 USB1.A5 | length 79.9
  Bottom Layer w10: USB1.A5@3766.02,3397.7 3766.82,3398.5 3766.82,3441.96 R21.1@3791.82,3466.96
$1N6548: D2.2 D3.2 R37.1 R38.1 | length 220.4
  Top Layer w15: D2.2@4214.82,3747.39 D3.2@4298.82,3747.39 4298.82,3776 4288.82,3786 4288.82,3831.39 R37.1@4289.07,3831.64 4336.5,3831.64 R38.1@4336.82,3831.96
$1N6963: R34.2 U14.2 | length 64.3
  Bottom Layer w10: U14.2@3466.54,3602.36 3500.18,3602.36 3509.78,3611.96 R34.2@3526.82,3611.96
$1N7827: C17.2 C21.2 U2.13 | length 264.2
  Top Layer w8: v3(3174.07,4692.13) 3200.74,4692.13 3222.64,4670.22 v1(3222.64,4644.55)
  Bottom Layer w8: C21.2@3148.28,4691.05 3149.36,4692.13 v3(3174.07,4692.13) 3174.07,4693.3 3176.82,4696.05 U2.13@3222.76,4696.05 ; C17.2@3206.82,4547.51 3206.82,4628.73 v1(3222.64,4644.55)
$1N7839: C18.2 C22.2 U2.12 | length 270.7
  Top Layer w6: v1(3180.93,4667.13) 3180.93,4636.94 3191.82,4626.05 3214.28,4626.05 3231.37,4608.95 3231.37,4579.03 3246.92,4563.49 v3(3266.64,4563.49)
  Bottom Layer w8: C22.2@3148.28,4641.05 3154.85,4641.05 v1(3180.93,4667.13) 3194.1,4680.3 U2.12@3222.76,4680.3
  Bottom Layer w10: v3(3266.64,4563.49) 3266.82,4563.31 C18.2@3266.82,4547.51
$1N8195: C12.2 U2.16 | length 110.8
  Bottom Layer w8: C12.2@3186.82,4839.59 3250.32,4776.08 U2.16@3250.32,4755.11
$1N8310: C11.2 U2.17 | length 96.6
  Bottom Layer w8: C11.2@3236.82,4839.59 3236.82,4811.05 3266.07,4781.79 U2.17@3266.07,4755.11
$1N8316: C9.2 U2.18 | length 86.5
  Bottom Layer w8: U2.18@3281.81,4755.11 3281.81,4834.58 C9.2@3286.82,4839.59
$1N8394: R3.1 R4.2 U2.20 | length 178.7
  Bottom Layer w8: U2.20@3313.31,4755.11 3313.31,4780.57 3343.79,4811.05 3371.82,4811.05 3381.82,4821.05 R4.2@3381.82,4844.01
  Bottom Layer w10: R4.2@3381.82,4844.01 R3.1@3426.82,4844.01
$1N8985: R31.2 R32.2 U11.2 | length 200.1
  Top Layer w10: U11.2@4633.4,5380.17 4633.4,5423.51 R31.2@4708.91,5499.01 R32.2@4758.91,5499.01
$1N9095: C50.2 R26.2 R28.2 R29.2 | length 159.4
  Top Layer w10: C50.2@4503.91,5488.49 4514.43,5499.01 R26.2@4558.91,5499.01 R28.2@4608.91,5499.01 R29.2@4658.91,5499.01
$1N9430: C26.1 R11.2 | length 49.8
  Bottom Layer w10: C26.1@3296.82,4399.59 3299.78,4396.63 R11.2@3299.78,4351.05
$1N9720: C35.1 R17.2 | length 46.8
  Bottom Layer w10: R17.2@3116.82,4404.01 3157.4,4404.01 C35.1@3161.82,4399.59
$1N9932: C32.2 U5.2 | length 87.6
  Top Layer w10: C32.2@3148.28,4646.05 3189.61,4604.72 U5.2@3189.61,4575.54
$1N10469: CN1.2 R12.2 | length 210.5
  Top Layer w10: CN1.2@3181.43,4941.05 3181.42,4861.44 3194.78,4848.09 R12.2@3194.78,4736.05
$1N10489: CN1.1 R18.2 | length 209.8
  Top Layer w10: CN1.1@3132.21,4941.05 3132.21,4840.65 3143.86,4829.01 R18.2@3143.86,4736.05
$1N15191: Q1.1 Q2.3 R15.1 | length 187.3
  Bottom Layer w10: Q1.1@3697.09,4783.45 3739.42,4783.45 3748.19,4774.67 Q2.3@3748.19,4746.05 3748.19,4699.67 3769.78,4678.09 R15.1@3769.78,4651.05
$1N15212: Q1.3 U4.3 | length 244.8
  Bottom Layer w10: Q1.3@3606.54,4746.05 3641.82,4710.77 3641.82,4626.05 3621.82,4606.05 3621.82,4526.2 U4.3@3620.36,4524.75
$1N16298: Q2.1 R19.2 | length 59.8
  Bottom Layer w10: Q2.1@3845.44,4783.45 3876.46,4783.45 R19.2@3896.82,4763.09
$1N31661: LED1.2 R35.1 | length 382.9
  Top Layer w10: v1(3295.82,3292.33) 3331.32,3256.83 LED1.2@3331.32,3163.8
  Bottom Layer w10: v1(3295.82,3292.33) 3295.82,3369 3365.82,3439 R35.1@3429.78,3439
$1N31690: LED1.1 U14.7 | length 479.6
  Top Layer w10: LED1.1@3268.32,3163.6 v1(3268.32,3299.32)
  Bottom Layer w10: U14.7@3237.54,3602.36 3266.39,3602.36 3281.82,3586.93 3281.82,3312.82 v1(3268.32,3299.32)
$1N53778: Q3.1 R37.2 | length 69.7
  Top Layer w15: Q3.1@4230.66,3893.09 4261.7,3893.09 R37.2@4289.07,3865.72
ADCVREF: C13.2 U2.15 U3.1 | length 989.7
  Top Layer w10: v2(3223.81,5442.49) 3223.81,5443.04 3309.54,5528.76 U3.1@3309.54,5546.05
  Bottom Layer w8: C13.2@3148.28,4791.05 3166.82,4791.05 3176.82,4781.05 3176.82,4754.73 3204,4727.55 U2.15@3222.76,4727.55
  Bottom Layer w10: C13.2@3148.28,4791.05 3148.28,4829.59 3085.82,4892.05 3085.82,5065.05 3223.81,5203.04 v2(3223.81,5442.49)
ADCVREF_SUB: R26.1 U12.4 | length 73
  Top Layer w10: R26.1@4558.91,5533.09 U12.4@4558.91,5606.05
AVDD_2V8: C1.2 FPC1.4 R1.2 | length 108
  Bottom Layer w8: FPC1.4@3884.19,5215.89 3884.19,5269.88 C1.2@3890.36,5276.05
  Bottom Layer w10: R1.2@3889.78,5321.05 3890.36,5320.47 C1.2@3890.36,5276.05
CAM_PWDN: FPC1.8 R8.2 | length 416.7
  Bottom Layer w10: FPC1.8@3805.39,5215.89 3805.39,5102.47 3971.82,4936.05 R8.2@4039.78,4936.05
CAM_RESET: FPC1.6 R6.2 | length 518.3
  Bottom Layer w10: FPC1.6@3844.79,5215.89 3844.79,5173.07 3851.82,5166.05 3851.82,5075.85 3945.62,4982.05 4082.56,4982.05 4095.99,4968.61 4095.99,4913.18 R6.2@4073.86,4891.05
D+: U1.14 U8.7 | length 1132.4
  Top Layer w8: U1.14@3439.36,5161.43 3439.36,5098.5 3526.06,5011.81 3526.06,4951.23 v1(3526.91,4950.38)
  Bottom Layer w8: v1(3526.91,4950.38) 3555.07,4922.22 3555.07,4709.3 3530.82,4685.05 3530.82,4650.05 3514.95,4634.18 3514.95,4392.92 3533.89,4373.98 3671.13,4373.98 U8.7@3766.82,4278.29
D-: U1.13 U8.8 | length 1129.7
  Top Layer w8: U1.13@3489.36,5161.43 3486.82,5158.89 3486.82,5076.05 3546.06,5016.81 v1(3546.06,4997.81)
  Bottom Layer w8: v1(3546.06,4997.81) 3501.82,4953.57 3501.82,4936.24 3541.07,4896.98 3541.07,4715.1 3516.82,4690.85 3516.82,4655.85 3500.95,4639.98 3500.95,4387.12 3528.09,4359.98 3665.33,4359.98 3716.82,4308.49 U8.8@3716.82,4278.29
DACVREF: C16.2 U2.14 | length 86.6
  Bottom Layer w8: C16.2@3148.28,4741.05 3166.82,4741.05 3196.06,4711.8 U2.14@3222.76,4711.8
DOCK_5V: D3.1 D4.2 U13.1 | length 734.1
  Top Layer w20: U13.1@3866.82,3794.24 3867.72,3793.34 v1(4012.85,3793.34) 4038.82,3767.37 D4.2@4078.82,3767.37 ; D3.1@4298.82,3620.61 v1(4298.82,3648)
  Bottom Layer w15: v1(4012.85,3793.34) 4085.52,3866 4192.82,3866 4265.04,3793.78 4265.04,3661.98 4278.82,3648.2 4298.62,3648.2 v1(4298.82,3648)
DOVDD_2V8: C2.2 C3.2 FPC1.11 R2.2 R6.1 | length 739.1
  Bottom Layer w8: C3.2@3733.28,5276.05 3746.34,5262.98 FPC1.11@3746.34,5215.89
  Bottom Layer w10: R2.2@3638.86,5321.05 3638.86,5338.09 3646.82,5346.05 3726.82,5346.05 3733.89,5338.98 3733.89,5321.66 C2.2@3733.28,5321.05 C3.2@3733.28,5276.05 ; FPC1.11@3746.34,5215.89 3746.34,5106.45 3768.52,5084.27 3803.8,5084.27 3997.02,4891.05 R6.1@4039.78,4891.05
DVP_HREF: FPC1.9 U1.7 | length 170.6
  Top Layer w8: v2(3778.05,5107.28) 3778.05,5150.12 U1.7@3789.36,5161.43
  Bottom Layer w8: v2(3778.05,5107.28) 3778.05,5157.28 3785.69,5164.92 FPC1.9@3785.69,5215.89
DVP_PCLK: FPC1.17 U1.21 | length 541.2
  Top Layer w8: U1.21@3384.27,4786.04 3401.81,4786.04 3487.82,4872.05 v4(3487.82,4921.95)
  Bottom Layer w8: v4(3487.82,4921.95) 3487.82,4967.85 3626.82,5106.85 3626.82,5214.46 FPC1.17@3628.24,5215.89
DVP_VSYNC: FPC1.7 U1.6 | length 157.9
  Top Layer w10: v2(3828.46,5112.68) 3839.36,5123.59 U1.6@3839.36,5161.43
  Bottom Layer w10: FPC1.7@3825.09,5215.89 3825.09,5116.05 v2(3828.46,5112.68)
DVP_Y2: FPC1.19 U1.19 | length 431.8
  Top Layer w8: U1.19@3384.27,4886.04 3413.58,4886.04 v4(3447.7,4920.16)
  Bottom Layer w8: v4(3447.7,4920.16) 3447.82,4920.28 3447.82,4961.79 3588.89,5102.87 FPC1.19@3588.89,5215.89
DVP_Y3: FPC1.21 U1.17 | length 323.2
  Top Layer w8: U1.17@3384.27,4986.04 v4(3426.82,4986.05)
  Bottom Layer w8: v4(3426.82,4986.05) 3549.49,5108.72 FPC1.21@3549.49,5215.89
DVP_Y4: FPC1.22 U1.12 | length 147.9
  Top Layer w10: v4(3529.37,5116.89) 3539.36,5126.88 U1.12@3539.36,5161.43
  Bottom Layer w8: v4(3529.37,5116.89) 3529.79,5117.31 FPC1.22@3529.79,5215.89
DVP_Y5: FPC1.20 U1.18 | length 381.4
  Top Layer w8: U1.18@3384.27,4936.04 v4(3426.82,4936.05)
  Bottom Layer w8: v4(3426.82,4936.05) 3435.82,4945.05 3435.82,4966.76 3569.19,5100.14 FPC1.20@3569.19,5215.89
DVP_Y6: FPC1.18 U1.20 | length 483
  Top Layer w8: U1.20@3384.27,4836.04 3401.82,4836.05 3467.82,4902.05 v4(3467.82,4941.04)
  Bottom Layer w8: v4(3467.82,4941.04) 3467.82,4964.82 3608.59,5105.6 FPC1.18@3608.59,5215.89
DVP_Y7: FPC1.16 U1.11 | length 265.7
  Top Layer w8: U1.11@3589.36,5161.43 3589.36,5094.79 v1(3616.2,5067.95)
  Bottom Layer w8: v1(3616.2,5067.95) 3638.82,5090.57 3638.82,5155.02 3647.89,5164.09 FPC1.16@3647.89,5215.89
DVP_Y8: FPC1.14 U1.10 | length 264.2
  Top Layer w8: U1.10@3639.36,5161.43 3643.01,5157.79 v1(3643.01,5066.47)
  Bottom Layer w8: v1(3643.01,5066.47) 3643.01,5067.24 3651.01,5075.24 3651.01,5150.24 3687.29,5186.52 FPC1.14@3687.29,5215.89
DVP_Y9: FPC1.12 U1.9 | length 149.7
  Top Layer w8: U1.9@3689.36,5161.43 3691.82,5158.98 v1(3691.82,5121.52)
  Bottom Layer w8: v1(3691.82,5121.52) 3691.82,5151.05 3726.69,5185.92 FPC1.12@3726.69,5215.89
EN: C19.2 R5.1 U1.3 | length 128.7
  Top Layer w10: C19.2@3955.36,5276.05 3955.36,5235.47 R5.1@3959.78,5231.05 3959.78,5216.05 3989.36,5186.46 U1.3@3989.36,5161.43